# Altium PCB rp2350_led_control_pcb.PcbDoc (part 2 of 4)
Units mm, origin at the board's own origin, x right, y up, seen from the top; angles counter-clockwise.
Board outline 143.9 x 131.3 mm, 4 copper layers (L1(SIG), L2(GND), L3(PWR), L4(SIG)), stack 1.591 mm thick; 168 components, 192 nets, 814 pads, 1003 vias.
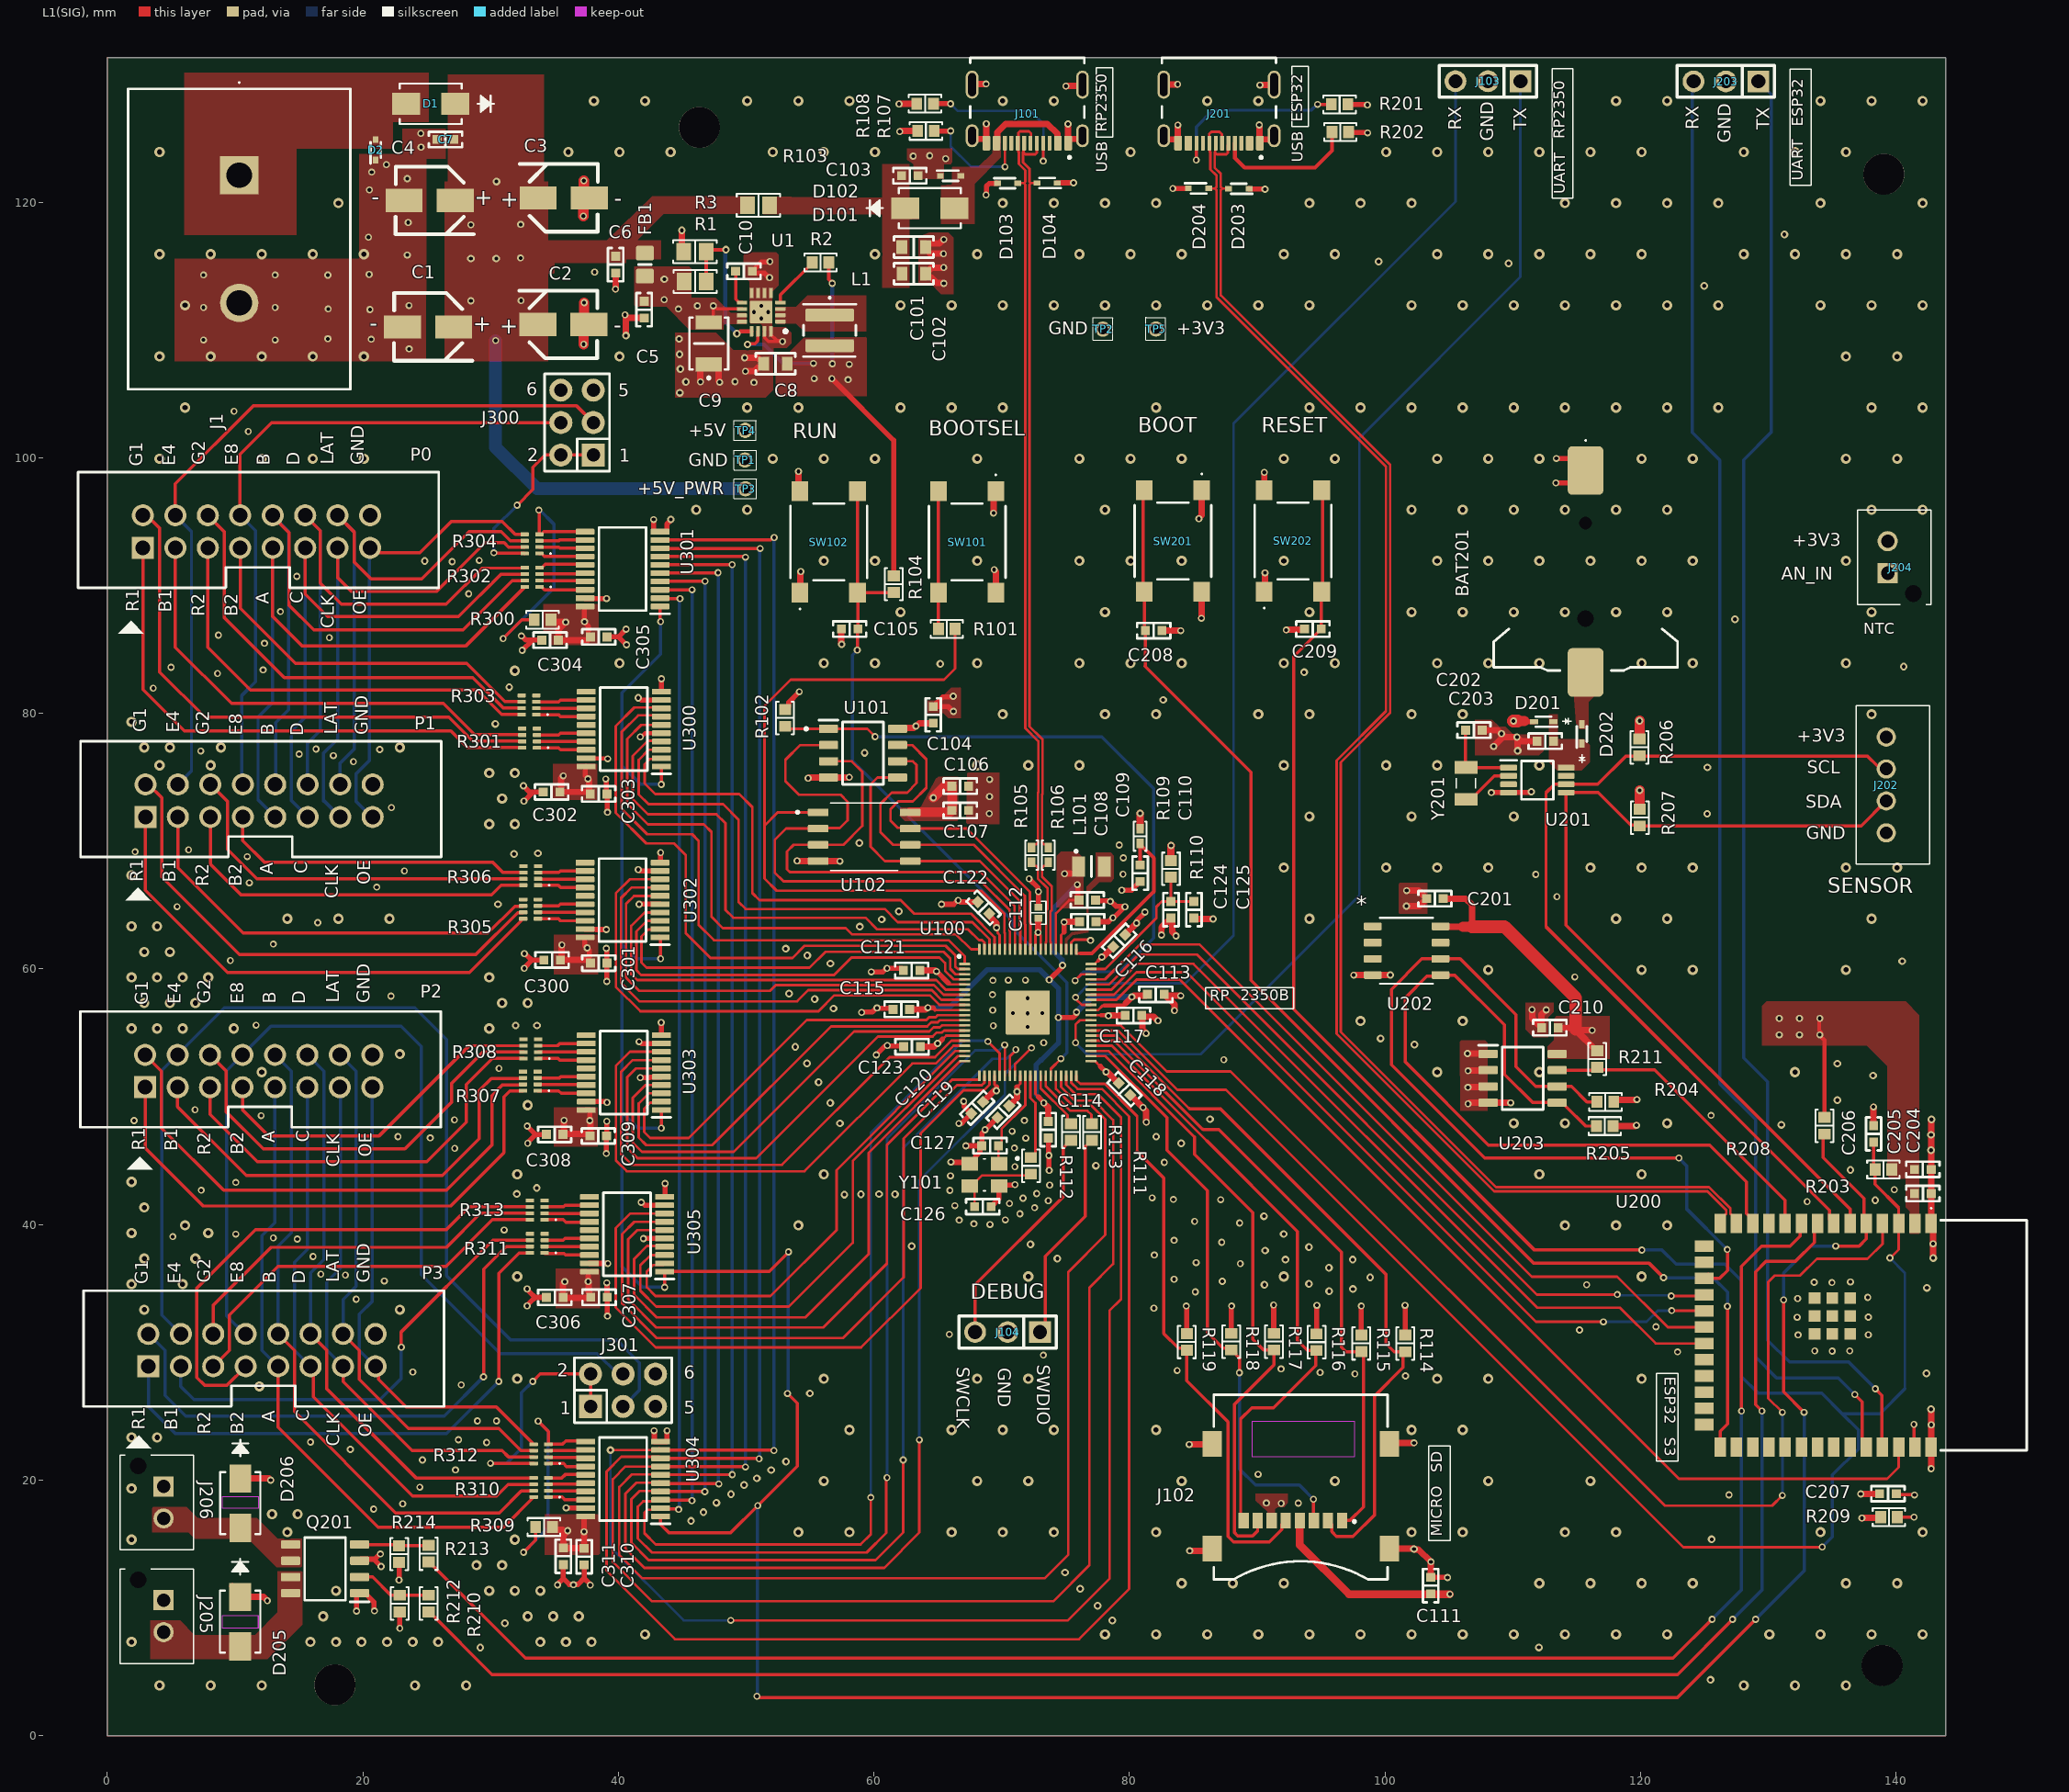
[diagram p0: L1(SIG) view]

## Via types
v1: diameter 0.55, hole 0.3, L1(SIG) to L4(SIG), 508 vias
v2: diameter 0.8, hole 0.4, L1(SIG) to L4(SIG), 383 vias
v3: diameter 0.6, hole 0.3, L1(SIG) to L4(SIG), 111 vias
v4: diameter 0.6, hole 0.25, L1(SIG) to L4(SIG), 1 vias

## Nets (pads, with @x,y where several pads share a name; then routed paths per layer and width w, separated by ;. In a path a pad name is that pad's centre, name@x,y a point inside that pad or via, vN(x,y) a via of type N, cw(c..) or ccw(c..) an arc to the next point about the centre after c; other vN are vias at no path point) (continued)
+5V: (continued)
  L1(SIG) w0.4: v1(37.309,15.962) 37.309,17.132 37.334,17.157 U304.20@37.428,17.157 ; U302.20@37.382,62.465 37.357,62.44 37.354,62.44 37.354,61.825 37.736,61.443 C301.2@37.736,60.526 ; U301.20@37.382,88.365 37.367,88.365 37.342,88.34 v1(37.342,87.167) 37.342,87.113 37.657,86.798 37.657,86.128 C305.2@37.754,86.031 ; U303.20@37.482,48.965 37.731,48.965 37.756,48.94 v1(37.756,48.128) ; U300.20@37.482,75.843 37.457,75.818 37.39,75.818 37.39,75.148 37.613,74.925 v1(37.613,74.871) ; v1(37.633,35.538) 37.633,36.286 37.658,36.311 U305.20@37.736,36.311
  L1(SIG) w0.5: R300.2@34.715,87.323 34.883,87.155 35.851,87.155 v1(35.87,87.136) 35.3,86.566 C304.2@35.3,85.731 37.56,85.731 37.754,85.925 C305.2@37.754,86.031 ; R309.2@34.819,16.325 34.819,16.275 34.994,16.1 35.617,16.1 ; v1(35.575,61.884) 35.556,61.865 35.556,60.798 C300.2@35.459,60.701 37.561,60.701 37.736,60.526 C301.2@37.812,60.45 ; C308.2@35.661,47.048 C308.2@35.713,47.101 ; C306.2@35.67,34.275 37.812,34.275 37.73,34.357 37.73,34.64 37.653,34.718 37.653,35.519 v1(37.633,35.538) ; C306.2@35.67,34.296 35.67,35.365 35.803,35.498 v1(35.803,35.525) ; v1(35.68,75.116) 35.68,75.089 35.515,74.923 35.515,73.946 C302.2@35.415,73.846 37.645,73.846 37.701,73.789 37.701,74.756 37.613,74.844 v1(37.613,74.871) ; v1(35.742,48.144) 35.723,48.125 35.723,47.11 C308.2@35.713,47.101 ; v1(36.026,16.043) 36.026,16.016 35.686,15.676 C310.2@35.686,14.688 35.703,14.671 37.295,14.671 C311.2@37.31,14.655 ; v1(37.309,15.962) 37.31,15.96 C311.2@37.31,14.655 ; C311.2@37.312,14.654 C311.2@37.31,14.655 ; v1(37.756,48.128) 37.756,48.1 37.81,48.046 37.81,47.029 C309.2@37.772,47.029 ; C309.2@37.772,47.101 C308.2@35.713,47.101
  L3(PWR) w1: 42.295,104.936 45.085,102.146 TP4.1@49.925,102.146
  other v1: 37.555,61.643 44.69,111.646 46.18,111.884 43.576,112.373
  other v3: 43.588,113.976
+5V_IN: C1.1 C2.1 C3.1 C4.1 C6.2 C7.2 D1.1 D205.1 D206.1 FB1.1 J205.1 J206.1 R103.2 TP3.1 | length 183.8
  L1(SIG) w0.5: D205.1@9.796,11.705 10.396,11.104 D205.1@10.396,10.85 12.218,10.85 12.506,10.562 v1(12.52,10.562) ; D206.1@10.406,20.123 12.641,20.123 12.773,19.992 v1(12.786,19.992)
  L3(PWR) w1: J205.1@4.4,10.6 4.438,10.562 v1(12.52,10.562) 14.642,10.562 16.516,12.437 16.516,16.871 19.637,19.992 ; J206.1@4.4,19.5 9.946,19.5 10.437,19.992 v1(12.786,19.992) 19.637,19.992 ; v3(30.453,121.619) 28.454,119.62 v1(28.454,118.235) v1(28.454,112.286) 28.454,109.62 23.145,104.31 23.145,82.567 26.205,79.507 26.205,52.683 29.775,49.113 29.775,43.064 26.018,39.307 26.018,26.373 19.637,19.992
  L4(SIG) w1: v1(30.385,109.175) 30.385,100.832 33.644,97.573 TP3.1@49.948,97.573
  other v1: 32.374,112.306 32.344,115.631 32.354,118.255
  other v3: 28.456,115.59 30.436,115.583
+5V_PWR: D1.2 D2.2 J1.1
A0: P0.9 P1.9 R302.5 | length 50.1
  L1(SIG) w0.25: P0.9@12.94,92.95 12.94,87.587 15.269,85.257 28.037,85.257 R302.5@32.67,89.89 ; P1.9@13.121,71.89 P1.9@13.14,71.89
  L4(SIG) w0.25: P0.9@12.94,92.95 12.94,80.847 11.793,79.7 11.793,73.2 11.83,73.2 P1.9@13.14,71.89
A1: P2.9 P3.9 R310.5 | length 51.8
  L1(SIG) w0.25: P3.9@13.368,28.896 13.368,24.14 21.191,16.317 31.021,16.317 R310.5@33.373,18.668
  L4(SIG) w0.25: P2.9@13.114,50.74 13.114,40.137 12.112,39.135 12.112,30.152 P3.9@13.368,28.896
ADC_REF: C124.2 C125.2 R110.1 U100.59 | length 12.7
  L1(SIG) w0.2: U100.59@76.992,59.982 78.107,59.982 82.103,63.978 82.103,64.858 82.528,65.282 C124.2@83.242,65.282 ; R110.1@83.242,67.182 C124.2@83.242,65.282 ; C125.2@85.042,65.282 C124.2@83.242,65.282
B0: P0.10 P1.10 R302.6 | length 50.4
  L1(SIG) w0.25: P0.10@12.94,95.49 12.94,95.425 14.204,94.162 14.204,88.468 16.148,86.524 27.844,86.524 31.685,90.365 32.645,90.365 R302.6@32.67,90.39 ; P1.10@13.14,74.43 P1.10@13.156,74.446
  L4(SIG) w0.25: P0.10@12.94,95.49 14.178,94.252 14.178,80.276 13.173,79.27 13.173,74.463 P1.10@13.14,74.43
B1: P2.10 P3.10 R310.6 | length 52.1
  L1(SIG) w0.25: P3.10@13.368,31.436 14.647,30.157 14.647,25.359 22.57,17.436 30.681,17.436 32.389,19.143 33.348,19.143 R310.6@33.373,19.168
  L4(SIG) w0.25: P2.10@13.114,53.28 14.41,51.984 14.41,39.337 13.368,38.295 P3.10@13.368,31.436
Bootsel: R101.2 SW101.3 SW101.4 | length 11.4
  L1(SIG) w0.25: R101.2@65.05,86.6 65.042,86.608 SW101.4@65.042,89.437 SW101.3@65.042,97.387 SW101.3@65.505,96.924
C0: P0.11 P1.11 R302.7 | length 45
  L1(SIG) w0.25: P0.11@15.48,92.95 15.48,89.324 17.242,87.562 27.491,87.562 30.794,90.865 32.645,90.865 R302.7@32.67,90.89 ; P1.11@15.68,71.89 P1.11@15.68,71.908
  L4(SIG) w0.25: P0.11@15.48,92.95 15.48,79.686 14.384,78.59 14.384,73.186 P1.11@15.68,71.89
C1: P2.11 P3.11 R310.7 | length 46.1
  L1(SIG) w0.25: P3.11@15.908,28.896 16.121,28.683 16.121,26.52 23.9,18.741 30.473,18.741 31.375,19.643 33.348,19.643 R310.7@33.373,19.668
  L4(SIG) w0.25: P2.11@15.654,50.74 15.654,38.037 14.653,37.036 14.653,30.151 P3.11@15.908,28.896